# Altium PCB Quectel_EG800AK-CN_PCB_Footprint_AD_20250802.PcbDoc
Units mm, origin at the board's own origin, x right, y up, seen from the top; angles counter-clockwise.
Board outline 152.4 x 101.6 mm, 2 copper layers (Top Layer, Bottom Layer); 1 components, 0 nets, 109 pads, 0 vias.
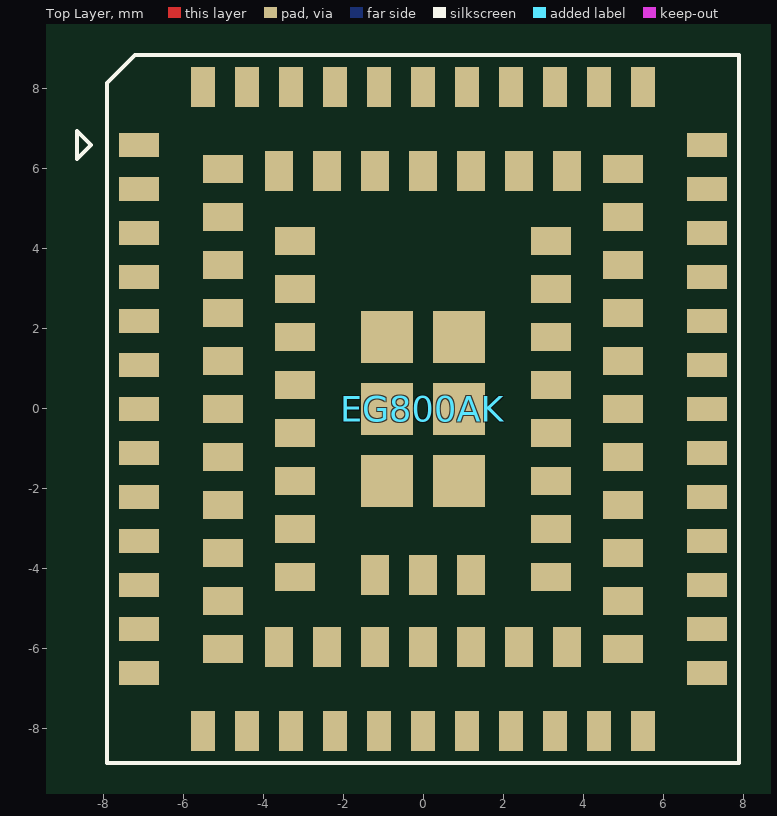
[diagram p0: Top Layer view]
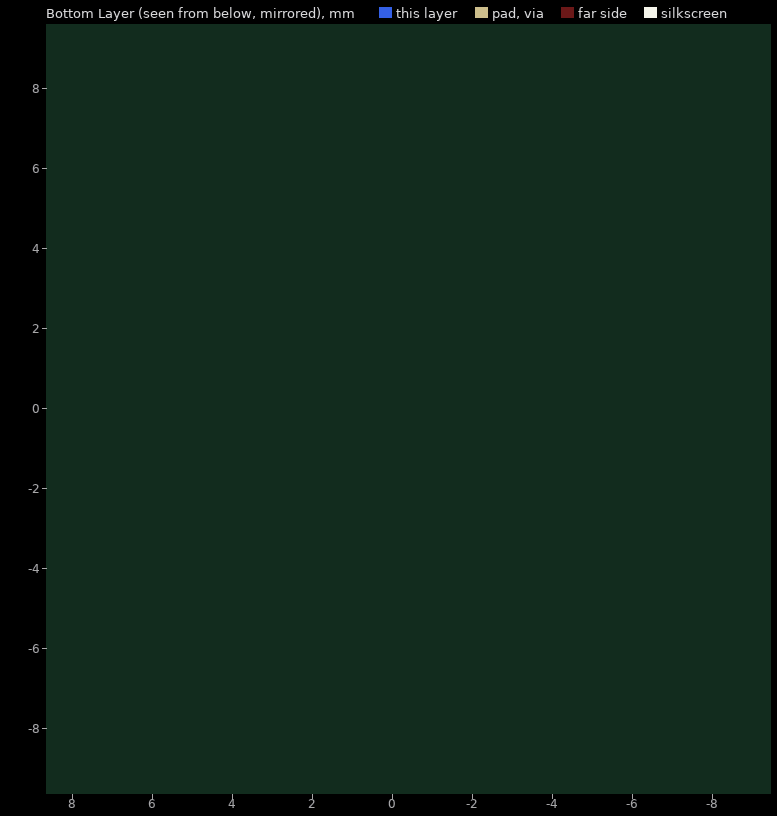
[diagram p1: Bottom Layer view, seen from below]

## Layer stack, top to bottom
Top Solder: solder mask 0.0102, Solder Resist, Dk 3.5
Top Layer: signal copper 0.0356
Dielectric1: dielectric 0.32, FR-4, Dk 4.8
Bottom Layer: signal copper 0.0356
Bottom Solder: solder mask 0.0102, Solder Resist, Dk 3.5

## Board outline
-70.739,-53.721 81.661,-53.721 81.661,47.879 -70.739,47.879

## Design rules (kind name [scope] priority, off if disabled: settings)
Clearance [All] p1: gap=0.254 ignorepadtopadclearanceinfootprint=FALSE except(0: Arc-Hole Track-Hole SMDPad-Hole THPad-Hole Via-Hole Fill-Hole Poly-Hole Region-Hole Text-Hole)
PolygonConnect [All] p1: connectstyle=Relief reliefconductorwidth=0.254 reliefentries=4 polygonreliefangle="90 Angle" airgapwidth=0.254
RoutingVias [All] p1: holewidth=0.711 width=1.27 viastyle="Through Hole" minholewidth=0.711 minwidth=1.27 maxholewidth=0.711 maxwidth=1.27
SilkToSolderMaskClearance [IsPad] p1 off: minsilkscreentomaskgap=0.254 clearancetoexposedcopper=TRUE
SolderMaskExpansion [All] p1: expansion=0.102 istentingtop=FALSE
Width [All] p1: maxlimit=0.254 minlimit=0.254 preferedwidth=0.254
29 further rules are at their usual default settings.

## Components (designator, comment, footprint, x,y, rotation, side; value= is the part's Value field where it differs from the comment)
EG800AK "Comment" EG800AK 0,0 r0 top

## Footprints (in the part's own frame and the unit in brackets; to place one, negate y for a bottom-side part, rotate by r counter-clockwise, add the part's x,y. Pads: shape width x height; smd on the part's side, far side on the other; paste and mask are expansions set on the pad)
EG800AK [mm] "EG800AK-CN Module 109PIN 17.7X15.8mm H2.4mm RO"
  rect 1x0.6 smd mask+0.05: 1(-7.1,6.6) 2(-7.1,5.5) 3(-7.1,4.4) 4(-7.1,3.3) 5(-7.1,2.2) 6(-7.1,1.1) 7(-7.1,0) 8(-7.1,-1.1) 9(-7.1,-2.2) 10(-7.1,-3.3) 11(-7.1,-4.4) 12(-7.1,-5.5) 13(-7.1,-6.6) 23(7.1,-6.6) 24(7.1,-5.5) 25(7.1,-4.4) 26(7.1,-3.3) 27(7.1,-2.2) 28(7.1,-1.1) 29(7.1,0) 30(7.1,1.1) 31(7.1,2.2) 32(7.1,3.3) 33(7.1,4.4) 34(7.1,5.5) 35(7.1,6.6)
  rect 0.6x1 smd mask+0.05: 14(-4.4,-8.05) 15(-3.3,-8.05) 16(-2.2,-8.05) 17(-1.1,-8.05) 18(0,-8.05) 19(1.1,-8.05) 20(2.2,-8.05) 21(3.3,-8.05) 22(4.4,-8.05) 36(4.4,8.05) 37(3.3,8.05) 38(2.2,8.05) 39(1.1,8.05) 40(0,8.05) 41(-1.1,8.05) 42(-2.2,8.05) 43(-3.3,8.05) 44(-4.4,8.05) 95(-5.5,-8.05) 96(5.5,-8.05) 97(5.5,8.05) 98(-5.5,8.05)
  rect 1x0.7 smd mask+0.05: 45(-5,4.8) 46(-5,3.6) 47(-5,2.4) 48(-5,1.2) 49(-5,0) 50(-5,-1.2) 51(-5,-2.4) 52(-5,-3.6) 53(-5,-4.8) 59(5,-4.8) 60(5,-3.6) 61(5,-2.4) 62(5,-1.2) 63(5,0) 64(5,1.2) 65(5,2.4) 66(5,3.6) 67(5,4.8) 73(-3.2,4.2) 74(-3.2,3) 75(-3.2,1.8) 76(-3.2,0.6) 77(-3.2,-0.6) 78(-3.2,-1.8) 79(-3.2,-3) 80(-3.2,-4.2) 81(3.2,-4.2) 82(3.2,-3) 83(3.2,-1.8) 84(3.2,-0.6) 85(3.2,0.6) 86(3.2,1.8) 87(3.2,3) 88(3.2,4.2) 99(-5,6) 100(-5,-6) 103(5,-6) 104(5,6)
  rect 0.7x1 smd mask+0.05: 54(-2.4,-5.95) 55(-1.2,-5.95) 56(0,-5.95) 57(1.2,-5.95) 58(2.4,-5.95) 68(2.4,5.95) 69(1.2,5.95) 70(0,5.95) 71(-1.2,5.95) 72(-2.4,5.95) 101(-3.6,-5.95) 102(3.6,-5.95) 105(3.6,5.95) 106(-3.6,5.95) 107(-1.2,-4.15) 108(0,-4.15) 109(1.2,-4.15)
  rect 1.3x1.3 smd mask+0.05: 89(-0.9,1.8) 90(-0.9,0) 91(-0.9,-1.8) 92(0.9,-1.8) 93(0.9,0) 94(0.9,1.8)
  silkscreen extent -8.65,-8.85 7.9,8.85, body extent -7.9,-8.85 7.9,8.85, height 2.4

## Nets (pads, with @x,y where several pads share a name; then routed paths per layer and width w, separated by ;. In a path a pad name is that pad's centre, name@x,y a point inside that pad or via, vN(x,y) a via of type N, cw(c..) or ccw(c..) an arc to the next point about the centre after c; other vN are vias at no path point)
pads on no net: EG800AK.1 EG800AK.2 EG800AK.3 EG800AK.4 EG800AK.5 EG800AK.6 EG800AK.7 EG800AK.8 EG800AK.9 EG800AK.10 EG800AK.11 EG800AK.12 EG800AK.13 EG800AK.14 EG800AK.15 EG800AK.16 EG800AK.17 EG800AK.18 EG800AK.19 EG800AK.20 EG800AK.21 EG800AK.22 EG800AK.23 EG800AK.24 EG800AK.25 EG800AK.26 EG800AK.27 EG800AK.28 EG800AK.29 EG800AK.30 EG800AK.31 EG800AK.32 EG800AK.33 EG800AK.34 EG800AK.35 EG800AK.36 EG800AK.37 EG800AK.38 EG800AK.39 EG800AK.40 EG800AK.41 EG800AK.42 EG800AK.43 EG800AK.44 EG800AK.45 EG800AK.46 EG800AK.47 EG800AK.48 EG800AK.49 EG800AK.50 EG800AK.51 EG800AK.52 EG800AK.53 EG800AK.54 EG800AK.55 EG800AK.56 EG800AK.57 EG800AK.58 EG800AK.59 EG800AK.60 EG800AK.61 EG800AK.62 EG800AK.63 EG800AK.64 EG800AK.65 EG800AK.66 EG800AK.67 EG800AK.68 EG800AK.69 EG800AK.70 EG800AK.71 EG800AK.72 EG800AK.73 EG800AK.74 EG800AK.75 EG800AK.76 EG800AK.77 EG800AK.78 EG800AK.79 EG800AK.80 EG800AK.81 EG800AK.82 EG800AK.83 EG800AK.84 EG800AK.85 EG800AK.86 EG800AK.87 EG800AK.88 EG800AK.89 EG800AK.90 EG800AK.91 EG800AK.92 EG800AK.93 EG800AK.94 EG800AK.95 EG800AK.96 EG800AK.97 EG800AK.98 EG800AK.99 EG800AK.100 EG800AK.101 EG800AK.102 EG800AK.103 EG800AK.104 EG800AK.105 EG800AK.106 EG800AK.107 EG800AK.108 EG800AK.109